# Altium PCB ProjetFinale.PcbDoc
Units mm, origin at the board's own origin, x right, y up, seen from the top; angles counter-clockwise.
Board outline 99.95 x 80.44 mm, 2 copper layers (Top Layer, Bottom Layer); 76 components, 34 nets, 190 pads, 37 vias.
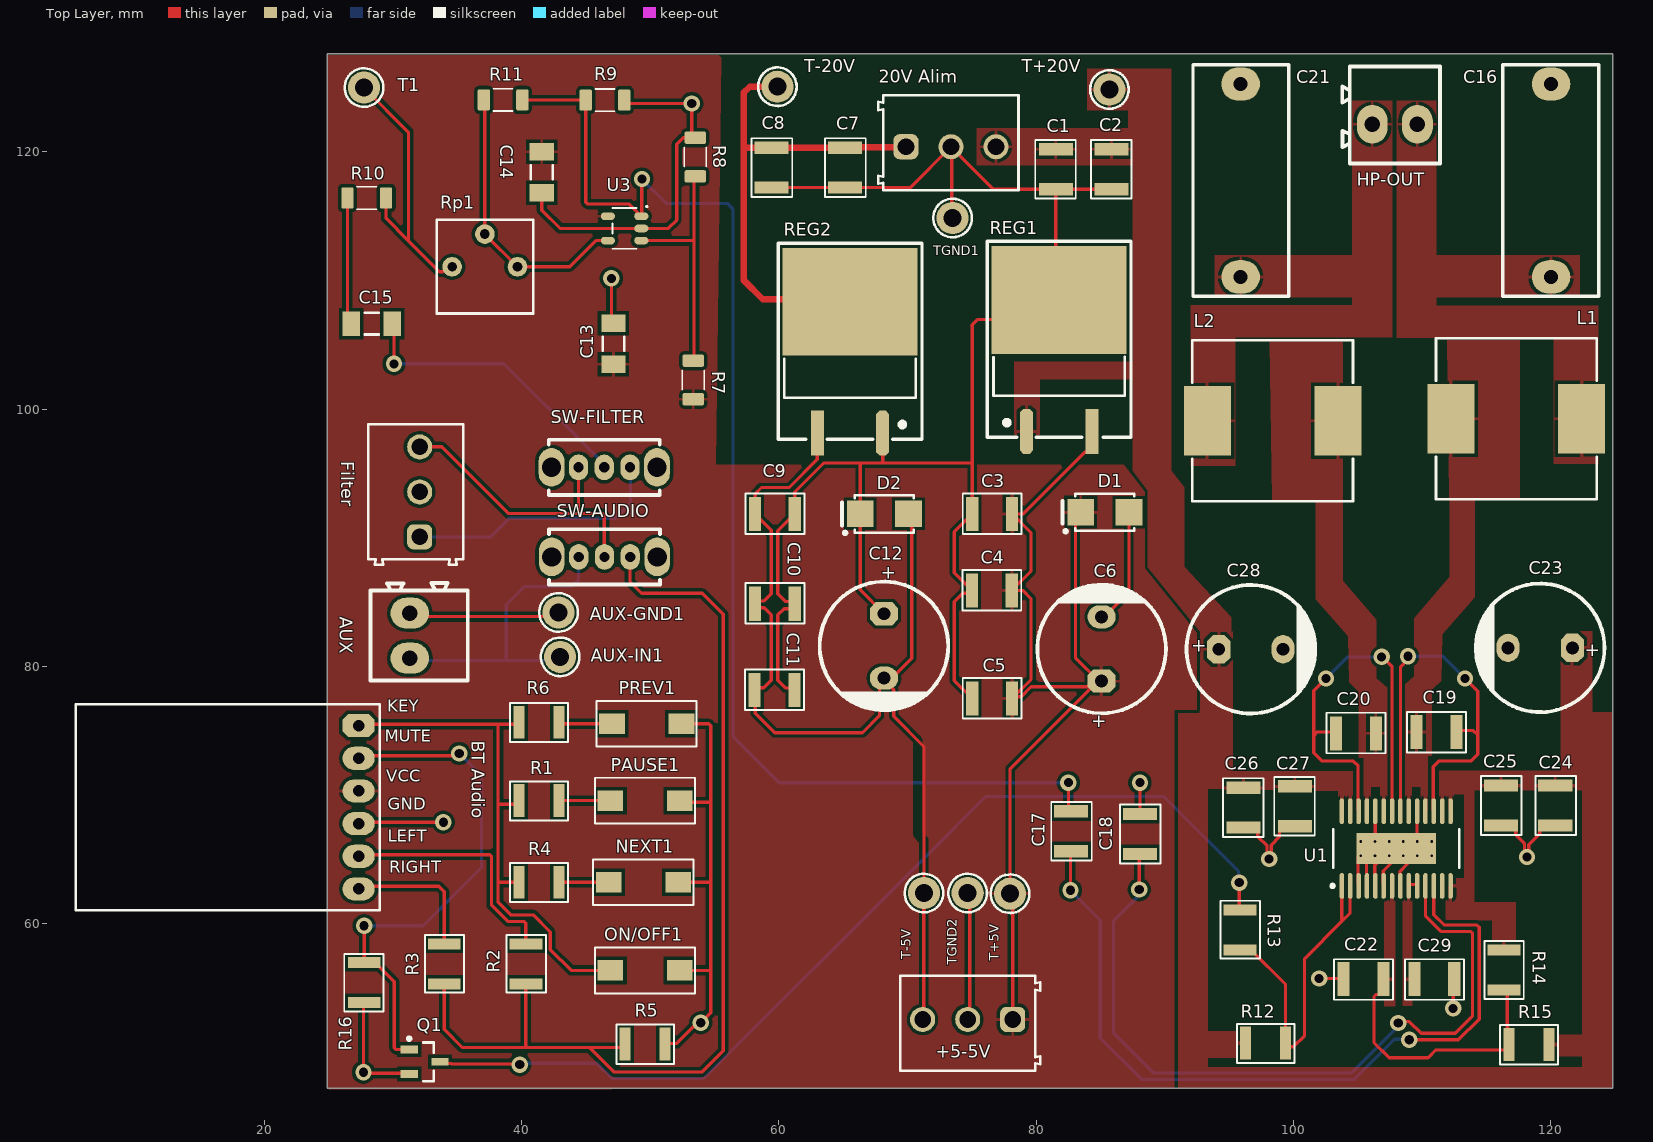
[diagram p0: Top Layer view]
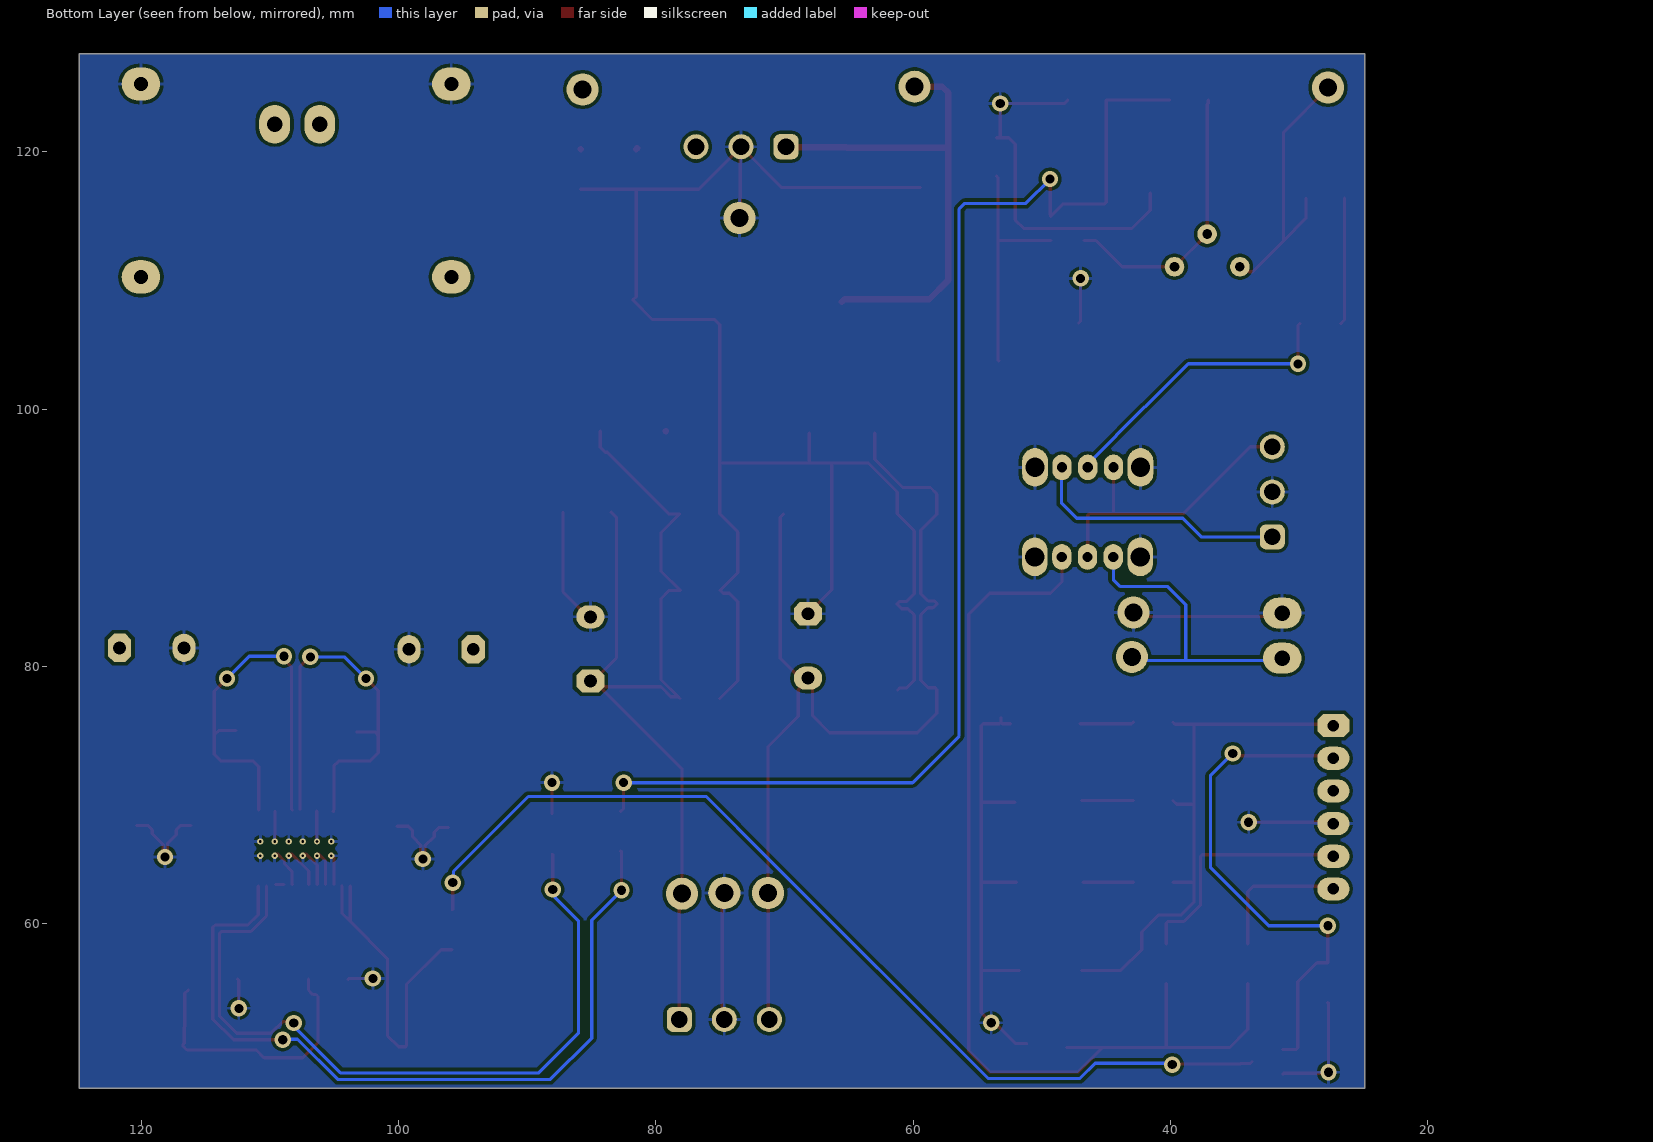
[diagram p1: Bottom Layer view, seen from below]
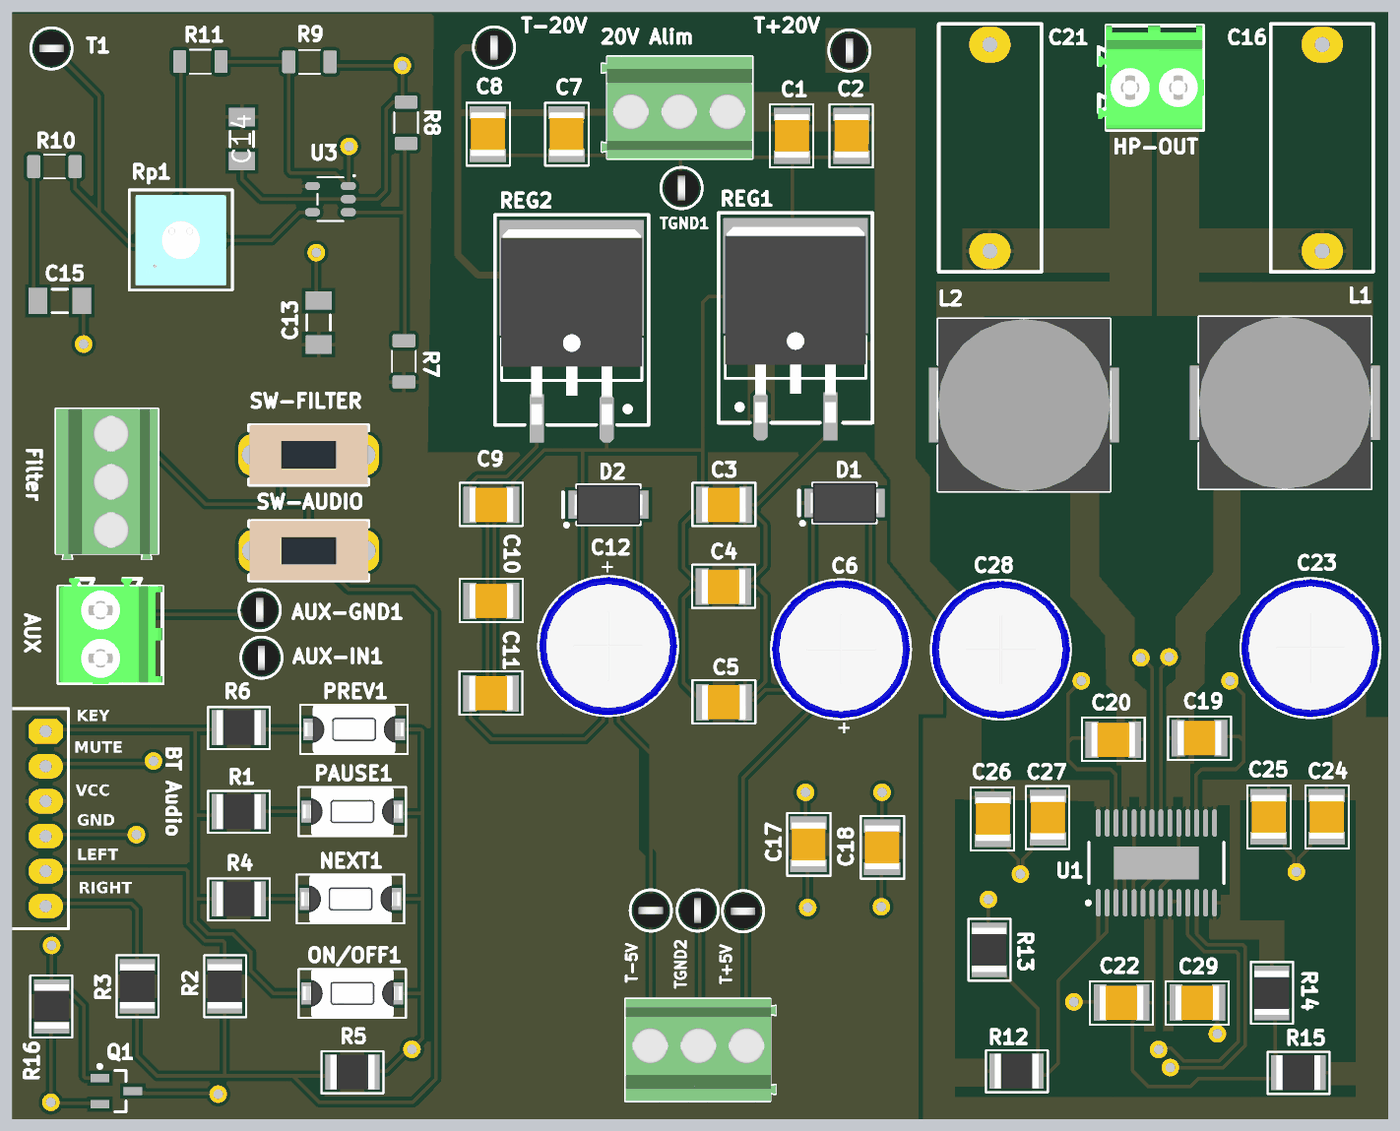
[diagram p2: 3D render of the assembled board from above, using the file's embedded part models]

## Layer stack, top to bottom
Top Solder: solder mask 0.0102, Solder Resist, Dk 3.5
Top Layer: signal copper 0.0356
Dielectric 1: dielectric 0.32, FR-4, Dk 4.8
Bottom Layer: signal copper 0.0356
Bottom Solder: solder mask 0.0102, Solder Resist, Dk 3.5

## Board outline
24.892,127.635 124.841,127.635 124.841,47.196 24.892,47.196

## Design rules (kind name [scope] priority, off if disabled: settings)
Clearance [All] p1: gap=0.254 ignorepadtopadclearanceinfootprint=FALSE
PolygonConnect [All] p1: connectstyle=Relief reliefconductorwidth=0.254 reliefentries=4 polygonreliefangle="90 Angle" airgapwidth=0.254
RoomDefinition PreAmplifier [InComponentClass('PreAmplifier')] p1: confinementstyle=ConfineIn formatcopy=TRUE lockcomponents=FALSE outline 24.894,99.468 55.944,99.468 55.944,127.656 24.894,127.656
RoutingVias [All] p1: holewidth=0.711 width=1.27 viastyle="Through Hole" minholewidth=0.711 minwidth=1.27 maxholewidth=0.711 maxwidth=1.27
SolderMaskExpansion [All] p1: expansion=0 istentingtop=FALSE
SupplyNets "Schematic Supply Nets_2" [InNet('PVCC')] p1: voltage=0.000
SupplyNets "Schematic Supply Nets_4" [InNet('+5V')] p2: voltage=0.000
SupplyNets "Schematic Supply Nets_3" [InNet('GND')] p3: voltage=0.000
SupplyNets "Schematic Supply Nets_1" [InNet('-5V')] p4: voltage=0.000
SupplyNets "Schematic Supply Nets" [InNet('-20V')] p5: voltage=0.000
Width Width_POWER [InNetClass('POWER')] p1: maxlimit=0.5 minlimit=0.5 preferedwidth=0.5 minimp=50.000000 maximp=50.000000 favimp=50.000000
Width [All] p2: maxlimit=0.254 minlimit=0.254 preferedwidth=0.254
30 further rules are at their usual default settings.

## Classes and differential pairs
net class POWER: -20V HP+ HP- PVCC
component class "Power Class D Amplifier": C16 C17 C18 C19 C20 C21 C22 C23 C24 C25 C26 C27 C28 C29 HP-OUT L1 L2 Q1 R12 R13 R14 R15 R16 U1
component class Audio_In: AUX AUX-GND1 AUX-IN1 "BT Audio" Filter NEXT1 ON/OFF1 PAUSE1 PREV1 R1 R2 R3 R4 R5 R6 SW-AUDIO SW-FILTER
component class PreAmplifier: C13 C14 C15 R7 R8 R9 R10 R11 Rp1 T1 T? U3
component class "Power Supply": "20V Alim" +5-5V C1 C2 C3 C4 C5 C6 C7 C8 C9 C10 C11 C12 D1 D2 REG1 REG2 T+5V T+20V T-5V T-20V TGND1 TGND2

## Components (designator, comment, footprint, x,y, rotation, side; value= is the part's Value field where it differs from the comment)
"20V Alim" "val?" 691214110003 73.383,120.698 r0 top
+5-5V "val?" 691214110003 74.682,52.242 r180 top
AUX "" TS-75x70 31.312,82.386 r90 top
AUX-GND1 "" "Test Point 1.32mm" 42.869,84.189 r90 top
AUX-IN1 "" "Test Point 1.32mm" 42.996,80.735 r90 top
"BT Audio" "M18" "Bluetooth-M18 flat" 27.324,69.038 r0 top
C1 "10µF/50V" 1206-C 81.537,118.644 r90 top
C2 "1µF/50V" 1206-C 85.855,118.644 r90 top
C3 "1uF/50V" 1206-C 76.584,91.847 r0 top
C4 "10uF/50V" 1206-C 76.558,85.9 r0 top
C5 "10uF/50V" 1206-C 76.584,77.496 r0 top
C6 "220uF/50V" C100x160 85.093,81.346 r90 top
C7 "10µF/50V" 1206-C 65.154,118.771 r270 top
C8 "1µF/50V" 1206-C 59.439,118.771 r270 top
C9 "1uF/50V" 1206-C 59.693,91.847 r0 top
C10 "10uF/50V" 1206-C 59.693,84.862 r0 top
C11 "10uF/50V" 1206-C 59.667,78.153 r0 top
C12 "220uF/50V" C100x160 68.176,81.582 r270 top
C13 "1µF" CAPACITOR_1206 47.142,105.084 r270 top value=100nF
C14 "100nF" CAPACITOR_1206 41.568,118.409 r90 top
C15 "1.5 uF" CAPACITOR_1206 28.35,106.65 r180 top value=100nF
C16 "1µF/100V" C180x75 120.042,117.774 r90 top
C17 "1µF" 1206-C 82.728,67.176 r270 top
C18 "1µF" 1206-C 88.074,66.96 r270 top
C19 "470nF/50V" 1206-C 111.132,74.898 r180 top
C20 "470nF/50V" 1206-C 104.868,74.79 r0 top
C21 "1µF/100V" C180x75 95.904,117.774 r270 top
C22 "1µF/50V" 1206-C 105.462,55.674 r180 top
C23 "100uF/50V" C100x160 119.194,81.432 r180 top
C24 "1nF/50V" 1206-C 120.366,69.174 r270 top
C25 "0.1µF/50V" 1206-C 116.154,69.174 r270 top
C26 "1nF/50V" 1206-C 96.12,69.012 r90 top
C27 "0.1µF/50V" 1206-C 100.116,69.12 r90 top
C28 "100uF/50V" C100x160 96.698,81.324 r0 top
C29 "1µF/50V" 1206-C 110.97,55.674 r180 top
D1 "RS1A" DO-214AC 85.347,91.974 r180 top
D2 "RS1A" DO-214AC 68.202,91.847 r180 top
Filter "val?" 691214110003 31.774,93.562 r90 top
HP-OUT "" TS-75x70 107.892,122.148 r180 top
L1 "33µH" SRR1260 117.342,99.252 r0 top
L2 "33µH" SRR1260 98.388,99.09 r180 top
NEXT1 "" TackS-35X60 49.473,63.209 r180 top
ON/OFF1 "" TackS-35X60 49.6,56.351 r180 top
PAUSE1 "" TackS-35X60 49.6,69.559 r180 top
PREV1 "" TackS-35X60 49.727,75.528 r180 top
Q1 "2N7002" INF-PG-SOT23_M 32.454,49.248 r0 top
R1 "51k" 1206-R 41.345,69.559 r180 top
R2 "10kR" 1206-R 40.329,56.859 r270 top
R3 "10kR" 1206-R 33.979,56.859 r270 top
R4 "33kR" 1206-R 41.345,63.209 r180 top
R5 "10kR" 1206-R 49.6,50.636 r180 top
R6 "9.1kR" 1206-R 41.345,75.655 r180 top
R7 "10k  Ω" RESISTOR_1206 53.344,102.263 r270 top
R8 "10k  Ω" RESISTOR_1206 53.502,119.597 r270 top
R9 "47k  Ω" RESISTOR_1206 46.482,124.025 r180 top
R10 "1k  Ω" RESISTOR_1206 27.96,116.411 r0 top
R11 "10k  Ω" RESISTOR_1206 38.556,124.038 r0 top
R12 "100k" 1206-R 97.848,50.706 r180 top
R13 "1kR" 1206-R 95.85,59.508 r270 top
R14 "100kR" 1206-R 116.37,56.376 r270 top
R15 "10R" 1206-R 118.314,50.598 r180 top
R16 "100k" 1206-R 27.756,55.404 r90 top
REG1 "MC7805" D2PAK254P1420X457-3N#1 81.791,104.534 r90 top
REG2 "MC7905" D2PAK254P1420X457-3N#2 65.535,104.387 r90 top
Rp1 "10k" 3362P 37.14,111.065 r0 top
SW-AUDIO "" SPDT-OS102011MS2QN1 46.44,88.506 r180 top
SW-FILTER "" SPDT-OS102011MS2QN1 46.425,95.467 r180 top
T1 "Pram_In" "Test Point 1.32mm" 27.744,124.997 r0 top
T+5V "" "Test Point 1.32mm" 77.976,62.316 r0 top
T+20V "" "Test Point 1.32mm" 85.698,124.848 r90 top
T-5V "" "Test Point 1.32mm" 71.28,62.37 r0 top
T-20V "" "Test Point 1.32mm" 59.886,125.064 r90 top
TGND1 "" "Test Point 1.32mm" 73.51,114.856 r90 top
TGND2 "" "Test Point 1.32mm" 74.682,62.37 r90 top
U1 "TP3111D1" TI-PWP28-5720X1950TP_M 108,65.826 r90 top
U3 "3" AOP-1671IDBVR 48.006,114.048 r180 top (schematic designator 3)

## Footprints (in the part's own frame and the unit in brackets; to place one, negate y for a bottom-side part, rotate by r counter-clockwise, add the part's x,y. Pads: shape width x height; smd on the part's side, far side on the other; paste and mask are expansions set on the pad)
1206-C [mm] "Chip Capacitor, 2-Leads, Body 3,20x2,50mm, IPC Medium Density"
  rect 0.95x2.65 smd: 1(-1.55,0) 2(1.55,0)
  silkscreen extent -2.29,-1.55 2.29,1.6, body extent -1.6,-1.25 1.6,1.25, height 0.55
1206-R [mm] "Chip Resistor, 2-Leads, Body 3,20x2,50mm, IPC Medium Density"
  rect 0.85x2.55 smd: 1(-1.55,0) 2(1.55,0)
  silkscreen extent -2.26,-1.5 2.24,1.55, body extent -1.6,-1.25 1.6,1.25, height 0.55
3362P [mil] "3362 - 1/4 ” Square Trimpot® Trimming Potentiometer"
  round 60 hole 30: 1(-100,0) 2(0,100) 3(100,0)
  silkscreen extent -148,-143 148,144, body extent -130,-130 130,130, height 189
691214110003 [mm] "3.50 mm Horizontal Entry Modular, 3p"
  rrect50% 1.95x1.95 hole 1.3: 1(-3.5,-0.3)
  round 1.95 hole 1.3: 2(0,-0.3) 3(3.5,-0.3)
  silkscreen extent -5.65,-3.7 5.25,3.7, body extent -5.7,-3.7 5.25,3.7, height 8.55
AOP-1671IDBVR [mm]
  oval 1.1x0.6 smd: 1(-1.3,-0.95) 2(-1.3,0) 3(-1.3,0.95) 4(1.3,0.95) 5(1.3,-0.95)
  silkscreen extent -1.79,-1.76 0.94,1.59, body extent -0.87,-1.53 0.87,1.52, height 1.45
"Bluetooth-M18 flat" [mm]
  oct 2.5x1.8 hole 0.9: 1(0,6.35)
  oval 2.5x1.8 hole 0.9: 2(0,3.81) 3(0,1.27) 4(0,-1.27) 5(0,-3.81) 6(0,-6.35)
  silkscreen extent -22,-8 1.65,8
C100x160 [mm] "10mmx16mm-pitch5mm"
  oct 1.8x2.2 hole 1: 1(-2.5,0)
  oval 1.8x2.2 hole 1: 2(2.5,0)
  silkscreen extent -5,-5 5.08,5, body extent -5.02,-5.03 5.03,5.03, height 16.53
C180x75 [mm] "spacing 15mm"
  oval 2.6x3 hole 1.1: 1(-7.5,0) 2(7.5,0)
  silkscreen extent -9,-3.71 9,3.75, body extent -9,-3.75 9,3.75, height 12
CAPACITOR_1206 [mm] "Chip Capacitor, Body 3.2x1.6mm, Height 1.7mm, IPC Low Density"
  rect 1.35x1.9 smd: 1(-1.6,0) 2(1.6,0)
  silkscreen extent -0.55,-0.85 0.55,0.85, body extent -1.7,-0.9 1.7,0.9, height 1.7
D2PAK254P1420X457-3N#1 [mm] "D2-PAK, 3-Pads, Body 7,78x8,48mm (max), IPC Medium Density"
  oct 3.5x1.016 smd: 1(-6.265,2.54)
  rect 3.5x1.016 smd: 3(-6.265,-2.54)
  rect 8.38x10.49 smd: 4(3.95,0)
  silkscreen extent -6.73,-5.59 8.51,5.59, body extent -6.71,-5.13 7.48,5.13, height 5.03
D2PAK254P1420X457-3N#2 [mm] "D2-PAK, 3-Pads, Body 7,78x8,48mm (max), IPC Medium Density"
  oct 3.5x1.016 smd: 1(-6.265,-2.54)
  rect 3.5x1.016 smd: 3(-6.265,2.54)
  rect 8.38x10.49 smd: 4(3.95,0)
  silkscreen extent -6.73,-5.59 8.51,5.59, body extent -6.71,-5.13 7.48,5.13, height 5.03
DO-214AC [mm] "Molded Diode, 2-Leads, Body 4,30x2,70mm, IPC Medium Density"
  rect 2.07x2.06 smd: 1(-1.875,0) 2(1.875,0)
  silkscreen extent -2.3,-1.45 3.3,1.6, body extent -2.52,-1.45 2.52,1.45, height 2.44
INF-PG-SOT23_M [mm] "SOT23, 3-Leads, Body 2.9x1.3mm, Pitch 0.95mm, IPC Low Density"
  rect 1.35x0.6 smd: 1(-1.2,0.95) 2(-1.2,-0.95) 3(1.2,0)
  silkscreen extent -1.32,-1.5 0.7,1.92, body extent -0.7,-1.5 0.7,1.5, height 1.1
RESISTOR_1206 [mm]
  rrect25% 0.95x1.65 smd: 1(-1.5,0) 2(1.5,0)
  silkscreen extent -0.76,-0.86 0.76,0.86, body extent -1.6,-0.8 1.6,0.8, height 0.55
SPDT-OS102011MS2QN1 [mm]
  oval 1.5x2 hole 0.8: 1(-2,0) 2(0,0) 3(2,0)
  oval 2x3 hole 1.5: 4(-4.1,0) 4(4.1,0)
  silkscreen extent -4.32,-2.15 4.32,2.15, body extent -4.3,-2.15 4.3,2.15, height 8
SRR1260 [mm] "Precision Wire Wound Inductor, 2-Leads, Body 12,50x12,50mm, IPC Medium Density"
  rect 3.65x5.4 smd: 1(-5.075,0) 2(5.075,0)
  silkscreen extent -6.25,-6.25 6.25,6.25, body extent -6.35,-6.25 6.35,6.25, height 6.1
TackS-35X60 [mm] "tack switch 3.5mmx6mm"
  rect 2x1.6 smd: 1(-2.7,0) 2(2.7,0)
  silkscreen extent -3.89,-1.78 3.91,1.78, body extent -3.6,-1.75 3.6,1.75, height 5
"Test Point 1.32mm" [mm] "VERO  20-2136"
  round 2.5 hole 1.4: 1(0,0)
  silkscreen extent -1.5,-1.5 1.5,1.5, body extent -1.27,-1.27 1.27,1.27, height 4.57
TI-PWP28-5720X1950TP_M [mm] "SOP, 28-Leads, Body 9.8x4.5mm, Pitch 0.65mm, Thermal Pad 6.17x2.4mm, IPC Low Density"
  oval 2x0.35 smd: 1(-2.9,4.225) 2(-2.9,3.575) 3(-2.9,2.925) 4(-2.9,2.275) 5(-2.9,1.625) 6(-2.9,0.975) 7(-2.9,0.325) 8(-2.9,-0.325) 9(-2.9,-0.975) 10(-2.9,-1.625) 11(-2.9,-2.275) 12(-2.9,-2.925) 13(-2.9,-3.575) 14(-2.9,-4.225) 15(2.9,-4.225) 16(2.9,-3.575) 17(2.9,-2.925) 18(2.9,-2.275) 19(2.9,-1.625) 20(2.9,-0.975) 21(2.9,-0.325) 22(2.9,0.325) 23(2.9,0.975) 24(2.9,1.625) 25(2.9,2.275) 26(2.9,2.925) 27(2.9,3.575) 28(2.9,4.225)
  rect 2.4x6.17 smd: 29(0,0)
  silkscreen extent -3.02,-4.9 1.5,5.07, body extent -2.25,-4.9 2.25,4.9, height 1.2
TS-75x70 [mm] "pitch 3.5mm"
  oval 2.4x3 hole 1.2: 1(-1.75,0) 2(1.75,0)
  silkscreen extent -3.5,-4.5 4.09,3.05, body extent -3.58,-4.5 4.12,3.05, height 9.15

## Part data
"20V Alim" +5-5V Filter: library part "Screw Terminal 3x", Manufacturer=WE, Manufacturer Part Number=691-214110-003, Supplier Part Number=710-691214110003, MOQ=1, Supplier=mouser, Supplier Unit Price=1.16
AUX HP-OUT: library part Connector-2, "Fixed Terminal Blocks PT 1.5/2-3.5H 2POS HRZ 3.5mm SCREW", Manufacturer="Phoenix Contact", Manufacturer Part Number=1984617, Supplier Part Number=651-1984617, MOQ=1, Supplier=Mouser, Supplier Unit Price=0.55
AUX-GND1 AUX-IN1 T1 T+5V T+20V T-5V T-20V TGND1 TGND2: library part "Test Point", "PCB Test Point, Type 8 Series, Black, Through Hole Mount, 1.32 mm, Phosphor Bronze", Manufacturer=VERO, Manufacturer Part Number=20-2136, Supplier Part Number=8731195, MOQ=100, Supplier=Farnell, Supplier Unit Price=0.132
"BT Audio": library part M18-Bluetooth, "BLUETOOTH AUDIO TRANSFER MODULE"
C1 C2 C3 C4 C5 C7 C8 C9 C10 C11 C17 C18 C19 C20 C22 C24 C25 C26 C27 C29: library part Capacitor-NP
C6 C12 C23 C28: library part Capacitor-Pol
C13 C14 C15: library part Capacitor, "Capacitor", Case-EIA=1206, Case-Metric=3216, Rated Voltage="100 V", Tolerance=Â±5%, Max Thickness="1.7 mm", Technology=SMT
C16 C21: library part Capacitor-NP, "Film Capacitor", Manufacturer=KEMET, Manufacturer Part Number=SMR15105J100B06L16.5CBULK, Supplier Part Number=80-SMR15105J100B0616, MOQ=1, Supplier=Mouser, Supplier Unit Price=4.3
D1 D2: library part Diode, "Clamp Diode 1A 1.1 V  / RS1A", Manufacturer=ONSEMI, Supplier Part Number=512-RS1A, Manufacturer Part Number=RS1A, MOQ=1, Supplier=Mouser, Supplier Unit Price=0.372
L1 L2: library part Inductor, "Fixed Inductors 33µH 20% SMD 1260", Manufacturer=Bourns, Manufacturer Part Number=SRR1260A-330M, Supplier Part Number=652-SRR1260A-330M, MOQ=1, Supplier=Mouser, Supplier Unit Price=0.791
NEXT1 ON/OFF1 PAUSE1 PREV1: library part "TackSwitch Simple", Manufacturer="MULTICOMP PRO", Manufacturer Part Number=DTSM-32S-B, Supplier Part Number=9471898, MOQ=10, Supplier=Farnell, Supplier Unit Price=0.188
Q1: library part 2N7002HW, "N-Channel Mosfet 1.75 V VGSth", Manufacturer=Diotec, Supplier Part Number=637-2N7002, Manufacturer Part Number=2N7002, MOQ=1, Supplier=Mouser, Supplier Unit Price=0.27
R1 R2 R3 R4 R5 R6 R12 R13 R14 R15 R16: library part Resistor
R7 R8 R9 R10 R11: library part Resistor, "Résistance"
REG1: library part MC7800, "Voltage Regulators –Positive-1.0 A - 5V", Manufacturer=onsemi, Manufacturer Part Number=MC7805BD2TR4G, Supplier Part Number=863-MC7805BD2TR4G, MOQ=1, Supplier=Mouser, Supplier Unit Price=0.90
REG2: library part MC7900, "Voltage Regulators –Negative-1.0 A", Manufacturer=onsemi, Manufacturer Part Number=MC7905ACD2TR4G, Supplier Part Number=863-MC7905ACD2TR4G, MOQ=1, Supplier=Mouser, Supplier Unit Price=0.809
Rp1: library part Potentiometer, "Potentiometer"
SW-AUDIO SW-FILTER: library part SPDT, "Slide Switches SPDT On-On", Manufacturer=C&K, Manufacturer Part Number=OS102011MS2QN1, Supplier Part Number=611-OS102011MS2QN1, MOQ=1, Supplier=Mouser, Supplier Unit Price=0.39
U1: library part TPA3111D1, Manufacturer=TI, Manufacturer Part Number=TPA3111D1PWP, Supplier Part Number=595-TPA3111D1PWP, MOQ=1, Supplier=Mouser, Supplier Unit Price=2.4
U3: library part OPA1671DBVT, "AOP"

## Via types
v1: diameter 1.27, hole 0.711, Top Layer to Bottom Layer, 25 vias
v2: diameter 0.5, hole 0.2, Top Layer to Bottom Layer, 12 vias

## Nets (pads, with @x,y where several pads share a name; then routed paths per layer and width w, separated by ;. In a path a pad name is that pad's centre, name@x,y a point inside that pad or via, vN(x,y) a via of type N, cw(c..) or ccw(c..) an arc to the next point about the centre after c; other vN are vias at no path point)
+5V: "BT Audio.3" +5-5V.1 C3.2 C4.2 C5.2 C6.1 C13.2 C14.2 D1.2 R7.2 REG1.3 T+5V.1 U3.5 | length 77.7
  Top Layer w0.254: C5.2 C5.2@78.28,77.642 ; +5-5V.1 78.182,62.11 T+5V.1 77.976,72.036 C6.1@84.389,78.449 ; D1.2 83.061,91.563 83.061,80.678 84.893,78.846 C6.1 84.695,78.449 C6.1@84.389,78.449 ; REG1.3 84.331,97.027 83.95,96.646 83.794,96.646 78.995,91.847 78.261,91.847 C3.2 79.606,90.375 79.606,87.398 C4.2 78.971,85.9 79.606,85.265 79.606,78.968 C5.2@78.28,77.642 ; C6.1@84.786,78.846 C6.1@84.389,78.449 ; C5.2@78.28,77.642 78.841,77.642 79.606,78.407 83.971,78.407 84.013,78.449 C6.1@84.389,78.449
-5V: +5-5V.3 C9.1 C10.1 C11.1 C12.2 D2.1 REG2.3 T-5V.1 | length 84.9
  Top Layer w0.254: REG2.3 62.995,96.086 60.81,93.901 58.651,93.901 58.154,93.404 58.154,91.858 C9.1 59.413,90.577 59.413,85.646 58.85,85.083 58.364,85.083 C10.1 58.447,84.558 58.85,84.558 59.413,83.995 59.413,78.915 58.824,78.326 58.29,78.326 C11.1 58.169,78.101 58.169,76.349 59.689,74.829 66.503,74.829 67.821,76.147 ; 67.824,76.147 67.824,78.73 C12.2 ; D2.1 70.335,91.589 70.335,80.612 68.783,79.06 68.583,79.06 C12.2@68.583,78.675 ; +5-5V.3 71.258,52.618 T-5V.1@71.258,61.992 ; T-5V.1@71.28,61.992 T-5V.1 71.28,73.764 68.942,76.102 68.942,78.16 68.583,78.519 C12.2@68.583,78.675 ; C12.2 C12.2@68.583,78.675 ; C12.2 68.176,78.863 68.583,78.456 C12.2@68.583,78.675
-20V: "20V Alim.1" C7.1 C8.1 REG2.4 T-20V.1 | length 39
  Top Layer w0.5: T-20V.1 57.726,125.064 57.254,124.592 57.254,120.321 ; REG2.4 65.332,108.539 58.745,108.539 57.254,110.03 57.254,120.321 ; 69.883,120.398 69.844,120.359 65.192,120.359 C7.1 C8.1 57.254,120.321
/SD: R12.1 R13.2 U1.1 U1.2 | length 27.2
  Top Layer w0.254: R13.2 96.7,57.958 99.398,55.26 R12.1 99.398,50.49 99.464,50.424 100.005,50.424 100.872,51.291 100.872,52.002 100.872,57.266 103.775,60.169 ; U1.1 103.775,60.169 ; U1.2 104.407,62.908 104.407,60.801 103.775,60.169
AUX-OUT: AUX-IN1.1 AUX.1 SW-AUDIO.3 | length 24.3
  Bottom Layer w0.254: AUX.1 31.493,80.455 38.805,80.455 ; AUX-IN1.1@42.996,80.455 38.805,80.455 ; SW-AUDIO.3 44.425,88.491 44.425,86.736 43.885,86.196 40.211,86.196 38.805,84.79 38.805,80.455
BT-L: "BT Audio.5" R2.1 | length 19.1
  Top Layer w0.254: 27.324,65.228 27.438,65.342 37.513,65.342 37.662,65.193 37.662,61.431 38.932,60.161 40.18,60.161 40.329,60.012 R2.1
BT-OUT: R2.2 R3.2 R5.2 SW-AUDIO.1 | length 79.1
  Top Layer w0.254: R3.2 33.979,51.779 35.402,50.356 40.329,50.356 ; R2.2 40.329,50.356 ; R5.2@48.05,50.356 45.282,50.356 ; SW-AUDIO.1 48.425,88.491 48.425,86.583 49.32,85.688 54.045,85.688 55.674,84.059 55.674,50.112 55.242,49.68 ; 55.214,49.646 54.019,48.451 47.187,48.451 45.282,50.356 ; 40.329,50.356 45.282,50.356
BT-R: "BT Audio.6" R3.1 | length 11
  Top Layer w0.254: 27.324,62.688 27.527,62.891 33.553,62.891 33.979,62.465 R3.1
GND: "20V Alim.2" "BT Audio.4" +5-5V.2 AUX-GND1.1 AUX.2 C1.1 C2.1 C3.1 C4.1 C5.1 C6.2 C7.2 C8.2 C9.2 C10.2 C11.2 C12.1 C13.1 C14.1 C16.2 C18.1 C21.1 C22.2 C23.2 C24.2 C25.2 C26.1 C27.1 C28.2 C29.1 D1.1 D2.2 Filter.2 NEXT1.1 ON/OFF1.1 PAUSE1.1 PREV1.1 Q1.2 R5.1 R8.1 R9.1 R16.1 REG1.4 REG2.1 SW-AUDIO.4 SW-FILTER.4 TGND1.1 TGND2.1 U1.3 U1.4 U1.5 U1.6 U1.8 U1.19 U1.24 U1.29 U3.2 | length 287.7
  Top Layer w0.254: 27.324,67.768 27.436,67.88 33.91,67.88 v1(33.912,67.878) ; R16.1 27.702,53.8 v1(27.702,48.438) 27.772,48.368 31.184,48.368 Q1.2 ; AUX.2@31.312,83.856 31.326,83.87 42.83,83.87 AUX-GND1.1@42.869,83.909 ; C14.1 41.568,115.464 42.984,114.048 U3.2 51.408,114.048 52.056,114.696 52.056,120.6 52.553,121.097 R8.1@53.232,121.097 ; v1(46.98,110.16) 46.98,106.846 C13.1 ; R9.1 48.252,123.755 v1(53.232,123.755) R8.1@53.232,121.097 ; SW-FILTER.4@50.525,94.538 SW-FILTER.4@50.525,95.187 ; R5.1 51.194,50.68 52.057,50.68 53.662,52.285 v1(53.924,52.285) ; ON/OFF1.1@51.759,56.351 ON/OFF1.1 54.706,56.351 ; NEXT1.1@51.992,63.209 NEXT1.1 54.706,63.209 ; PAUSE1.1@52.107,69.432 54.706,69.432 ; PREV1.1 PREV1.1@53.079,75.528 ; PREV1.1@53.168,76.024 53.168,75.665 53.3,75.533 53.659,75.533 53.664,75.528 54.557,75.528 54.706,75.379 54.706,69.432 ; R8.1 R8.1@53.232,121.097 ; v1@53.988,52.349 54.706,53.067 54.706,56.351 ; C8.2 C7.2 70.206,117.221 73.383,120.398 73.446,120.334 ; C11.2 61.05,78.32 60.51,78.32 59.921,78.908 59.921,83.995 60.409,84.483 60.895,84.483 61.243,84.831 C10.2 61.074,85.031 60.536,85.031 59.921,85.646 59.921,90.525 C9.2 61.243,93.553 63.496,95.806 66.327,95.806 ; REG2.1 68.075,95.854 68.027,95.806 ; C12.1 68.176,84.087 66.327,85.936 D2.2 66.327,95.806 ; TGND1.1 73.446,114.919 73.446,120.334 ; +5-5V.2 74.844,52.704 74.844,62.208 TGND2.1 ; C5.1 73.637,78.893 73.637,85.011 74.301,85.675 74.783,85.675 C4.1 73.637,87.271 73.637,90.45 C3.1 75.034,95.806 ; C6.2 85.293,83.846 87.222,85.775 D1.1 ; C2.1 C1.1 ; C18.1 v1(88.074,70.956) ; C26.1 96.895,67.462 97.243,67.114 97.243,66.755 97.956,66.042 97.956,65.178 v1(98.118,65.016) 98.28,65.178 98.28,66.096 98.918,66.734 98.918,67.222 99.266,67.57 C27.1 ; v1(102.006,55.728) 103.858,55.728 C22.2 ; U1.3@105.034,63.034 105.034,65.209 U1.29@105.209,65.384 ; U1.4@105.684,63.034 105.684,64.861 106.207,65.384 U1.29@106.309,65.384 ; U1.5@106.334,63.034 106.334,64.517 107.202,65.384 U1.29@107.409,65.384 ; v2(106.35,66.376) 106.375,66.401 U1.24 ; U1.6@106.984,63.034 107.003,63.052 107.003,64.085 108.302,65.384 U1.29@108.509,65.384 ; U1.8@108.284,63.034 108.303,63.052 108.303,64.077 108.879,64.653 108.879,64.861 109.402,65.384 U1.29@109.609,65.384 ; U1.19 109.625,66.401 v2(109.65,66.376) ; v1(112.428,53.406) 112.428,55.582 C29.1 ; C25.2 116.953,67.624 117.301,67.276 117.301,66.917 117.972,66.246 v1@117.972,65.26 ; v1(118.165,65.178) 118.314,65.327 118.314,66.132 119.168,66.986 119.168,67.276 119.516,67.624 C24.2 ; 54.706,56.351 54.706,63.209 ; 54.706,63.209 54.706,69.432 ; 66.327,95.806 68.027,95.806 ; 68.027,95.806 75.034,95.806 ; 73.446,120.334 76.687,117.094 C1.1 ; 75.034,95.806 75.034,106.553 75.441,106.96 80.267,106.96 REG1.4 81.537,108.738 C1.1
  other v2: 105.25,65.276 106.35,65.276 107.45,65.276 108.55,65.276 109.65,65.276 110.75,65.276 105.25,66.376 107.45,66.376 108.55,66.376 110.75,66.376
GVDD: C29.2 U1.9 U1.10 | length 0.7
  Top Layer w0.254: U1.9@108.934,63.034 U1.10@109.584,63.034
HP+: C16.1 HP-OUT.1 L1.2
HP-: C21.2 HP-OUT.2 L2.2
KEY: "BT Audio.1" ON/OFF1.2 R1.2 R4.2 R6.2 | length 41.5
  Top Layer w0.254: 27.324,75.388 27.438,75.502 38.17,75.502 ; R4.2 38.17,63.209 ; R1.2 39.515,69.279 38.17,69.279 ; R6.2 39.642,75.502 38.17,75.502 ; ON/OFF1.2 43.848,56.351 42.234,57.965 42.234,59.34 40.905,60.669 39.142,60.669 38.17,61.641 38.17,63.209 ; 38.17,63.209 38.17,69.279 ; 38.17,69.279 38.17,75.502
"NetBT Audio_2": "BT Audio.2" Q1.1 R16.2 | length 40.7
  Top Layer w0.254: 27.324,72.848 27.512,73.036 34.966,73.036 v1(35.154,73.224) ; v1(27.756,59.832) R16.2 28.606,56.954 29.386,56.174 29.395,56.174 30.087,55.483 30.087,50.347 30.235,50.198 Q1.1
  Bottom Layer w0.254: v1(27.756,59.832) 32.346,59.832 36.882,64.368 36.882,71.496 v1(35.154,73.224)
NetC15_1: C15.1 SW-FILTER.2 | length 22.9
  Top Layer w0.254: C15.1 30.078,106.522 v1(30.078,103.518)
  Bottom Layer w0.254: v1(30.078,103.518) 38.599,103.518 41.91,100.207 ; 41.976,100.166 SW-FILTER.2@46.425,95.717 ; SW-FILTER.2@46.425,95.187 SW-FILTER.2@46.425,95.437
NetC17_2: C17.2 U1.12 | length 61.6
  Top Layer w0.254: v1(82.674,62.586) 82.674,65.572 C17.2 ; v1(109.01,50.96) 109.015,50.954 112.838,50.954 114.448,52.564 114.448,59.715 114.277,59.886 111.726,59.886 110.925,60.687 U1.12
  Bottom Layer w0.254: v1(82.674,62.586) 84.996,60.264 84.996,51.084 88.204,47.876 104.738,47.876 107.867,51.005 108.965,51.005 v1(109.01,50.96)
NetC18_2: C18.2 U1.11 | length 59.8
  Top Layer w0.254: v1(88.02,62.64) 88.02,65.356 C18.2 ; v1(108.162,52.272) 108.356,52.466 108.446,52.377 109.029,52.377 109.944,51.462 112.59,51.462 113.94,52.812 113.94,59.229 113.791,59.378 111.516,59.378 110.275,60.619 U1.11
  Bottom Layer w0.254: v1(88.02,62.64) 87.826,62.446 87.826,62.014 86.022,60.21 86.022,51.462 89.1,48.384 104.528,48.384 108.162,52.018 v1(108.162,52.272)
NetC19_1: C19.1 U1.17 U1.21 | length 32.7
  Top Layer w0.254: U1.21@108.284,68.834 108.325,68.875 108.325,79.94 108.918,80.533 v1(108.918,80.784) ; U1.17@110.875,68.843 110.875,72.198 111.307,72.63 113.791,72.63 114.331,73.17 114.331,74.682 ; C19.1@112.641,75.006 114.007,75.006 114.331,74.682 ; v1(113.346,79.056) 114.331,78.071 114.331,74.682
  Bottom Layer w0.254: v1(108.918,80.784) 111.618,80.784 v1(113.346,79.056)
NetC19_2: C19.2 L1.1 U1.18 U1.20
NetC20_1: C20.1 U1.22 U1.26 | length 32.5
  Top Layer w0.254: v1(102.546,79.056) 101.587,78.097 101.587,74.615 ; C20.1@103.277,74.898 101.871,74.898 101.587,74.615 ; U1.26@105.034,68.834 105.034,72.261 104.665,72.63 102.235,72.63 101.587,73.278 101.587,74.615 ; U1.26 U1.26@105.093,68.708 ; v1(106.866,80.73) 106.915,80.73 107.675,79.97 U1.22@107.675,68.875
  Bottom Layer w0.254: v1(102.546,79.056) 104.22,80.73 v1(106.866,80.73)
NetC20_2: C20.2 L2.1 U1.23 U1.25
NetC22_1: C22.1 R14.2 R15.2 U1.7 | length 21.2
  Top Layer w0.254: C22.1 107.012,54.824 106.664,54.476 106.421,54.476 106.272,54.327 106.272,50.747 107.447,49.572 110.475,49.572 111.069,50.166 116.466,50.166 116.764,50.464 R15.2 116.682,50.68 116.682,51.895 116.628,51.949 116.628,54.568 R14.2
NetFilter_1: Filter.1 SW-FILTER.1 | length 20
  Bottom Layer w0.254: Filter.1 37.591,90.062 39.033,91.504 47.288,91.504 48.457,92.673 48.457,95.155 SW-FILTER.1@48.425,95.187
NetFilter_3: Filter.3 SW-AUDIO.2 SW-FILTER.3 | length 23.1
  Top Layer w0.254: Filter.3 33.781,97.062 38.958,91.885 44.425,91.885 ; SW-FILTER.3@44.425,95.187 44.425,91.885 ; SW-AUDIO.2 46.425,88.521 46.425,91.736 46.276,91.885 44.425,91.885
NetNEXT1_2: NEXT1.2 R4.1 | length 3.9
  Top Layer w0.254: R4.1 NEXT1.2
NetPAUSE1_2: PAUSE1.2 R1.1 | length 4
  Top Layer w0.254: R1.1 PAUSE1.2
NetPREV1_2: PREV1.2 R6.1 | length 4.2
  Top Layer w0.254: R6.1 43.022,75.528 PREV1.2
NetQ1_3: Q1.3 R13.1 | length 77.2
  Top Layer w0.254: Q1.3 33.785,49.117 34.529,49.117 34.56,49.086 39.798,49.086 v1(39.852,49.032) ; v1(95.796,63.18) 95.796,61.112 R13.1
  Bottom Layer w0.254: v1(39.852,49.032) 39.96,49.14 45.846,49.14 47.034,47.952 54.162,47.952 71.253,65.043 76.086,69.876 89.91,69.876 95.739,64.047 95.739,63.237 v1(95.796,63.18)
NetR10_2: R10.2 Rp1.1 T1.1 | length 21.9
  Top Layer w0.254: T1.1 31.202,121.539 31.202,113.086 ; R10.2 29.46,114.828 31.202,113.086 ; Rp1.1 34.256,111.065 33.874,110.682 33.606,110.682 31.202,113.086
OPA+: R7.1 R8.2 U3.3 | length 18.5
  Top Layer w0.254: U3.3 53.407,113.098 ; R7.1 53.408,103.826 53.408,113.098 ; R8.2 53.408,118.002 53.408,113.098
OPA-: R11.1 Rp1.2 Rp1.3 U3.4 | length 21.9
  Top Layer w0.254: R11.1 37.056,123.768 37.14,123.684 Rp1.2 Rp1.3 43.742,111.065 45.775,113.098 U3.4
OPA-Audio-IN: C15.2 R10.1 | length 9.9
  Top Layer w0.254: R10.1 26.46,106.94 C15.2
OUT_5V: C17.1 R9.2 R11.2 U3.1 | length 99.3
  Top Layer w0.254: R11.2@40.056,124.025 R9.2 44.982,116.087 45.131,115.938 48.366,115.938 U3.1 ; U3.1@49.331,115.129 49.331,117.857 v1(49.356,117.882) ; v1(82.512,70.956) 82.512,68.942 C17.1
  Bottom Layer w0.254: v1(49.356,117.882) 51.246,115.992 55.998,115.992 56.43,115.56 56.43,74.574 60.048,70.956 v1(82.512,70.956)
PVCC: "20V Alim.3" C1.2 C2.2 C23.1 C24.1 C25.1 C26.2 C27.2 C28.1 R12.2 R14.1 R15.1 REG1.1 T+20V.1 U1.14 U1.15 U1.16 U1.27 U1.28 | length 0.5
  Top Layer w0.5: 76.883,120.398 76.985,120.296 ; REG1.1@79.225,98.295 REG1.1 REG1.1@79.237,98.255 ; C1.2@81.435,120.296 C1.2 ; T+20V.1 T+20V.1@85.825,124.721 ; C2.2 C2.2@85.859,120.19
pads on no net: U1.13

## Polygon pours and split planes (outlines as drawn)
+5V on Top Layer "+5V_L01_P002" (solid, pour order 2): 24.892,127.498 55.523,127.498 55.084,95.668 86.828,95.668 88.438,93.567 88.438,87.62 92.502,82.615 92.502,76.626 90.727,76.626 90.727,47.196 24.892,47.068
PVCC on Top Layer "PVCC_L01_P031" (solid, pour order 31): 122.472,70.831 122.472,51.354 119.61,51.354 119.61,49.68 124.848,49.68 124.848,70.831
PVCC on Top Layer "PVCC_L01_P022" (solid, pour order 22): 112.474,70.37 112.967,70.37 124.848,70.37 124.848,76.41 123.228,76.41 123.228,82.736 120.797,82.736 120.797,71.884 111.348,71.884 111.348,68.75 112.49,68.75
PVCC on Top Layer "PVCC_L01_P032" (solid, pour order 32): 91.044,70.134 91.044,52.11 91.044,49.572 96.498,49.572 96.498,51.624 93.366,51.624 93.366,70.578 91.044,70.578 91.044,70.2
PVCC on Top Layer "PVCC_L01_P021" (solid, pour order 21): 103.485,70.316 102.992,70.316 91.057,70.471 91.057,76.356 92.731,76.356 92.731,82.682 95.31,82.682 95.31,71.83 104.611,71.83 104.611,68.696 103.469,68.696
PVCC on Top Layer "PVCC_L01_P047" (solid, pour order 47): 87.588,126.468 83.97,126.468 83.97,123.552 83.97,123.228 87.588,123.228
NetC19_2 on Top Layer "NETC19_2_L01_P024" (solid, pour order 24): 108.626,69.119 109.201,69.119 109.201,70.631 109.922,70.631 109.922,69.065 110.462,69.065 110.462,76.896 108.626,76.896 108.626,70.685
NetC20_2 on Top Layer "NETC20_2_L01_P025" (solid, pour order 25): 105.458,69.12 106.033,69.12 106.033,70.632 106.754,70.632 106.754,69.066 107.294,69.066 107.294,76.897 105.458,76.897 105.458,70.686
GVDD on Top Layer "GVDD_L01_P026" (solid, pour order 26): 108.499,63.034 109.255,63.034 109.255,53.622 108.499,53.622
NetC22_1 on Top Layer "NETC22_1_L01_P028" (solid, pour order 28): 107.082,62.999 107.931,62.999 107.931,53.587 107.082,53.587
PVCC on Top Layer "PVCC_L01_P029" (solid, pour order 29): 112.438,70.005 112.47,70.038 113.305,70.038 113.305,63.504 111.847,63.504 111.847,61.29 114.061,61.29 114.061,70.902 112.857,70.902 112.441,70.902 112.438,70.473
PVCC on Top Layer "PVCC_L01_P030" (solid, pour order 30): 115.452,60.264 111.834,60.264 111.834,61.668 117.288,61.668 117.288,58.104 115.452,58.104
NetC20_2 on Top Layer "NETC20_2_L01_P034" (solid, pour order 34): 98.187,105.246 103.842,105.246 103.842,92.934 98.366,92.934
NetC19_2 on Top Layer "NETC19_2_L01_P035" (solid, pour order 35): 111.957,105.354 117.612,105.354 117.612,93.042 112.136,93.042
NetC20_2 on Top Layer "NETC20_2_L01_P036" (solid, pour order 36): 105.082,72.9 105.082,78.03 104.354,78.758 104.274,82.35 101.736,85.213 101.736,94.716 103.842,94.716 103.842,86.643 106.434,83.615 106.434,79.082 107.298,78.319 107.298,72.9
NetC19_2 on Top Layer "NETC19_2_L01_P037" (solid, pour order 37): 110.756,73.037 110.756,78.167 111.484,78.895 111.564,82.487 114.102,85.351 114.102,94.392 112.158,94.392 112.158,86.97 109.404,83.752 109.404,79.22 108.54,78.456 108.54,73.037
HP- on Top Layer "HP-_L01_P038" (solid, pour order 38): 104.598,108.054 92.016,108.054 92.016,95.58 95.472,95.58 95.472,105.57 107.676,105.57 107.676,123.984 104.598,123.984
HP+ on Top Layer "HP+_L01_P040" (solid, pour order 40): 111.113,108.03 123.714,108.03 123.714,95.742 120.239,95.742 120.239,105.546 108.035,105.546 108.035,123.96 111.113,123.96
HP- on Top Layer "HP-_L01_P041" (solid, pour order 41): 93.906,111.942 105.462,111.942 105.462,108.702 93.906,108.702
HP+ on Top Layer "HP+_L01_P042" (solid, pour order 42): 110.7,111.942 122.256,111.942 122.256,108.702 110.7,108.702
PVCC on Top Layer "PVCC_L01_P043" (solid, pour order 43): 92.77,82.682 88.668,87.745 88.668,93.69 87.531,95.202 87.531,100.326 87.531,118.962 75.384,118.962 75.384,121.824 90.504,121.824 90.504,95.202 91.53,93.906 91.53,87.745 95.162,83.808 95.162,82.682
PVCC on Top Layer "PVCC_L01_P044" (solid, pour order 44): 87.75,103.68 78.3,103.68 78.3,97.956 80.298,97.956 80.298,102.33 88.074,102.33 88.074,103.68
PVCC on Top Layer "PVCC_L01_P045" (solid, pour order 45): 87.156,121.824 87.156,126.468 90.504,126.468 90.504,121.824
PVCC on Top Layer "PVCC_L01_P046" (solid, pour order 46): 91.044,49.572 91.044,47.196 124.848,47.196 124.848,50.004 122.472,50.004 122.472,48.816 93.366,48.816 93.366,49.626 93.312,49.572
GND on Bottom Layer "GND_L02_P001" (solid, pour order 1): 24.892,127.635 24.892,47.196 124.841,47.196 124.841,127.635

## Silkscreen, mask and mechanical layers (free items; w line width, h text height)
Mechanical 1:
  the board outline again, w1.2

## Text inside footprints (layer, text, board x,y; h text height)
"BT Audio": Top Overlay "KEY" at 29.538,76.14 h1.6; Top Overlay "MUTE" at 29.376,73.836 h1.6; Top Overlay "VCC" at 29.484,70.71 h1.6; Top Overlay "GND" at 29.592,68.548 h1.6; Top Overlay "LEFT" at 29.592,66.042 h1.6; Top Overlay "RIGHT" at 29.7,63.634 h1.6
C6: Top Overlay "+" at 85.704,75.123 h1.8 r90
C12: Top Overlay "+" at 67.721,87.858 h1.8 r270
C23: Top Overlay "+" at 123.876,82.021 h1.8 r180
C28: Top Overlay "+" at 92.07,80.789 h1.8